# Altium PCB machbiendoilenhdon.PcbDoc
Units mm, origin at the board's own origin, x right, y up, seen from the top; angles counter-clockwise.
Board outline 117 x 94 mm, 2 copper layers (Top Layer, Bottom Layer); 109 components, 122 nets, 460 pads, 163 vias.
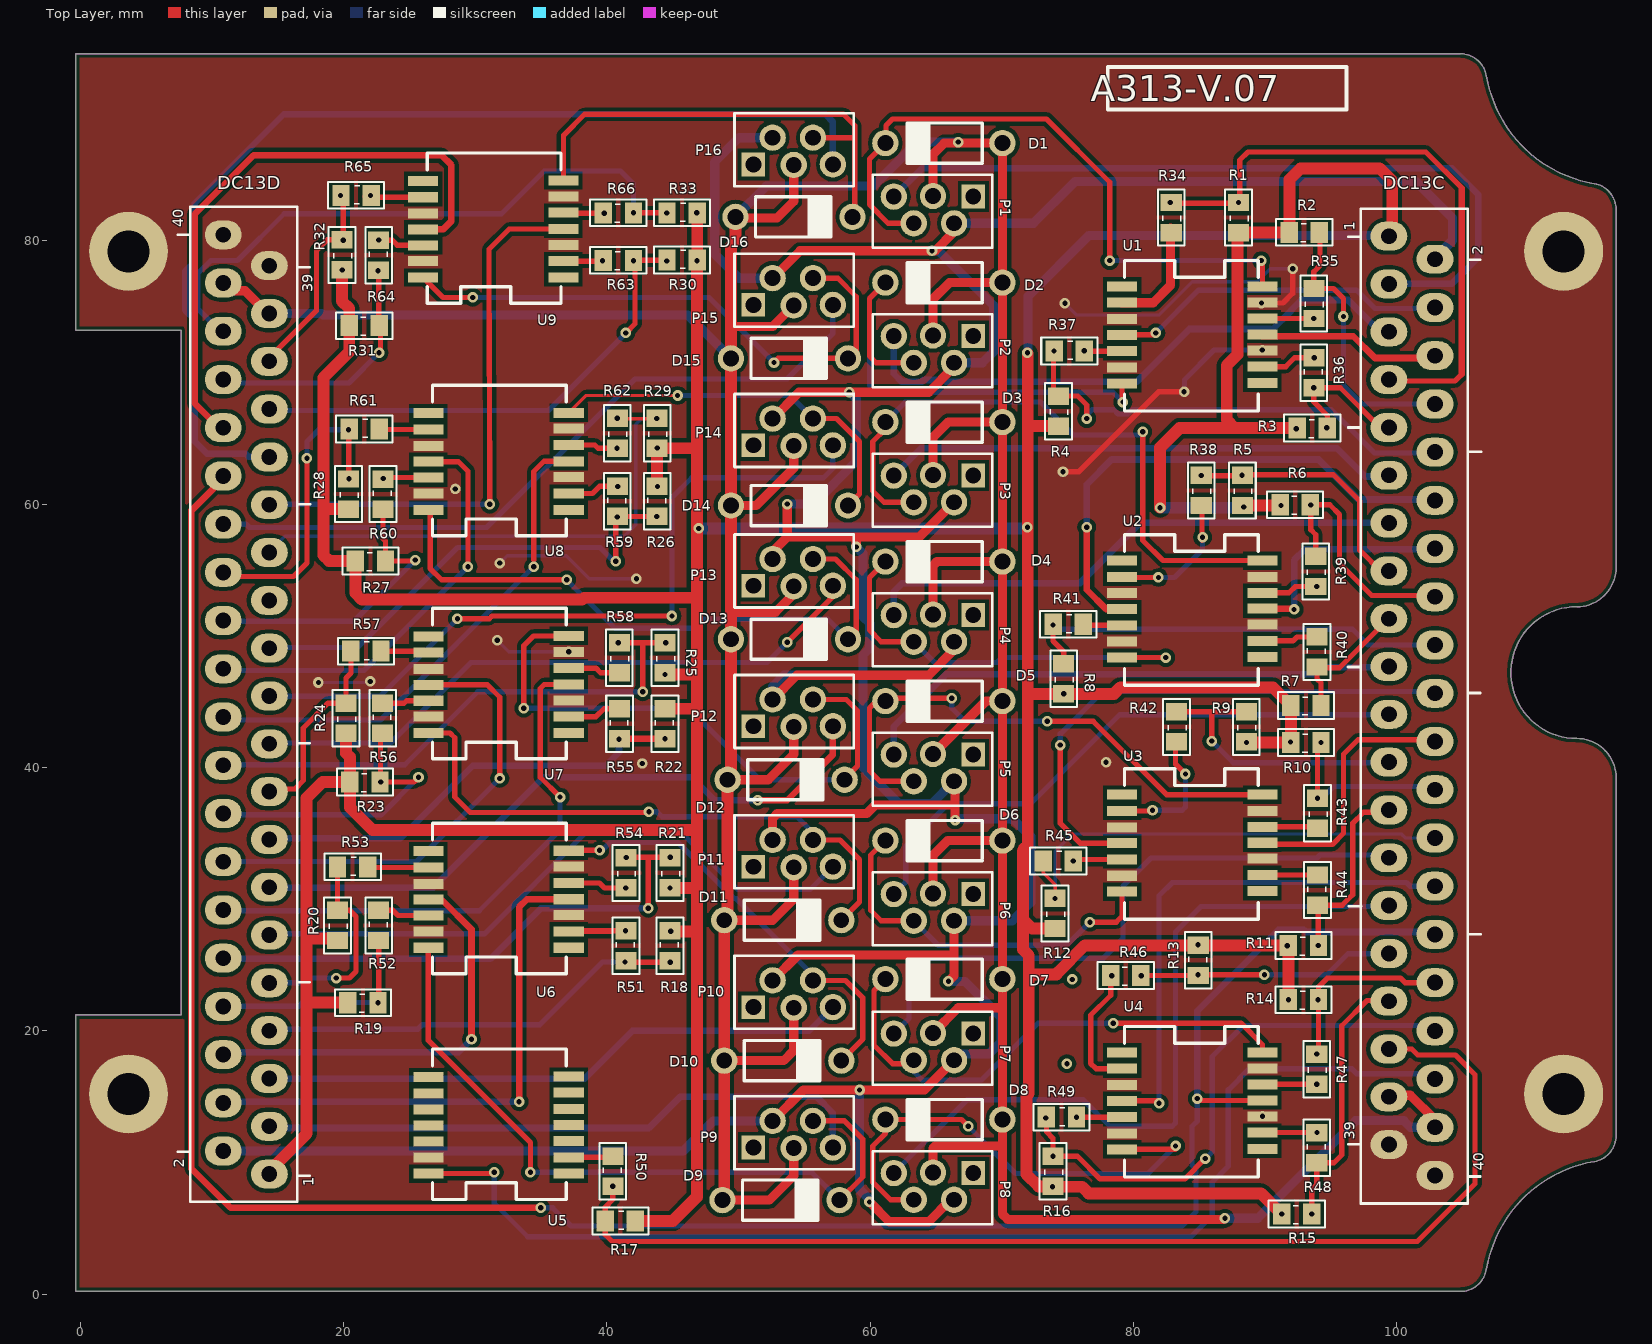
[diagram p0: Top Layer view]
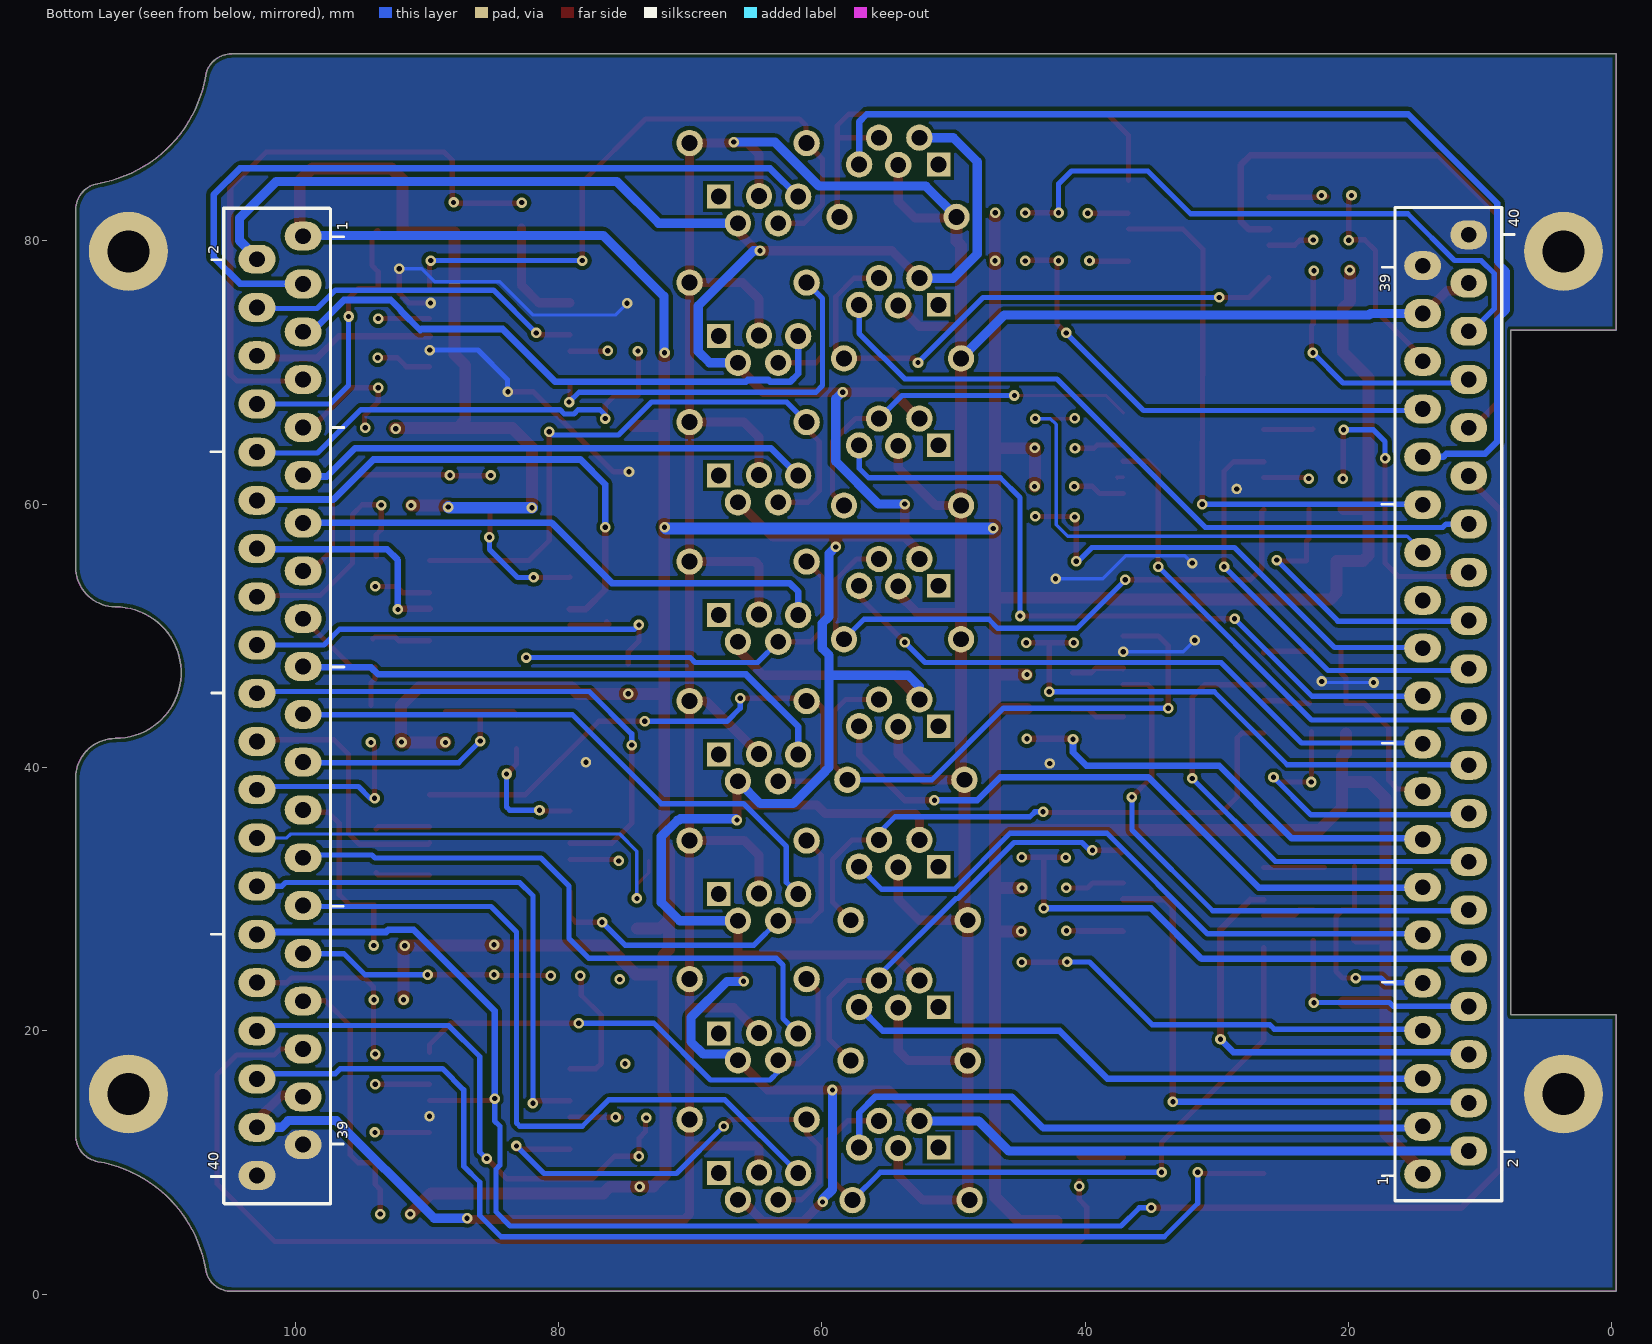
[diagram p1: Bottom Layer view, seen from below]

## Layer stack, top to bottom
Top Solder: solder mask 0.0102, Solder Resist, Dk 3.5
Top Layer: signal copper 0.0356
Dielectric1: dielectric 0.32, FR-4, Dk 4.8
Bottom Layer: signal copper 0.0356
Bottom Solder: solder mask 0.0102, Solder Resist, Dk 3.5

## Board outline
-0.331,21.203 7.669,21.203 7.669,73.203 -0.331,73.203 -0.331,94.203 104.837,94.203 cw(c104.837,92.203) 106.809,92.536 ccw(c116.669,94.203) 115.002,84.343 cw(c114.669,82.371) 116.669,82.371 116.669,55.203 cw(c113.669,55.203) 113.669,52.203 ccw(c113.669,47.203) 113.669,42.203 cw(c113.669,39.203) 116.669,39.203 116.669,12.035 cw(c114.669,12.035) 115.002,10.063 ccw(c116.669,0.203) 106.809,1.869 cw(c104.837,2.203) 104.837,0.203 -0.331,0.203

## Design rules (kind name [scope] priority, off if disabled: settings)
Clearance [All] p1: gap=0.3 ignorepadtopadclearanceinfootprint=FALSE except(0: Arc-Hole Track-Hole SMDPad-Hole THPad-Hole Via-Hole Fill-Hole Poly-Hole Region-Hole Text-Hole; 0.2: Arc-SMDPad Arc-THPad Track-SMDPad Track-THPad SMDPad-THPad THPad-THPad Fill-Fill Fill-Poly Fill-Region Poly-Poly Poly-Region Region-Region)
HoleSize [All] p1: absolutevalues=TRUE maxlimit=5 minlimit=0.025 maxpercent=80.000 minpercent=20.000
MinimumSolderMaskSliver [All] p1: minsoldermaskwidth=0.2
PolygonConnect [All] p1: connectstyle=Direct reliefconductorwidth=0.254 reliefentries=4 polygonreliefangle="90 Angle" airgapwidth=0.254
RoutingVias [All] p1: holewidth=0.4 width=0.8 viastyle="Through Hole" minholewidth=0.4 minwidth=0.8 maxholewidth=0.4 maxwidth=0.8
SilkToSilkClearance [All] p1: silktosilkclearance=0.1
SilkToSolderMaskClearance SilkscreenOverComponentPads [IsPad] p1: minsilkscreentomaskgap=0.01 clearancetoexposedcopper=TRUE
SolderMaskExpansion [All] p1: expansion=0.102
UnRoutedNet [InNet('GND')] p1:
Width Width_2 [(InNet('+27V') OR InNet('+27VB/X'))] p1: maxlimit=3 minlimit=0.3 preferedwidth=0.7 minimp=50.000000 maximp=50.000000 favimp=50.000000
Width Width_1 [(InNet('+5V'))] p2: maxlimit=3 minlimit=0.254 preferedwidth=0.9 minimp=50.000000 maximp=50.000000 favimp=50.000000
Width [All] p3: maxlimit=5 minlimit=0.254 preferedwidth=0.4 minimp=50.000000 maximp=50.000000 favimp=50.000000
25 further rules are at their usual default settings.

## Classes and differential pairs
component class machbiendoilenhdon: D17 J7 J8 J9 J10 J11 J12 J13 J14 J15 J16 J17

## Components (designator, comment, footprint, x,y, rotation, side; value= is the part's Value field where it differs from the comment)
D1 "DIODE" "DIOT _REV1" 61.158,88.056 r270 top
D2 "DIODE" "DIOT _REV1" 61.158,77.461 r270 top
D3 "DIODE" "DIOT _REV1" 61.158,66.865 r270 top
D4 "DIODE" "DIOT _REV1" 61.158,56.27 r270 top
D5 "DIODE" "DIOT _REV1" 61.158,45.674 r270 top
D6 "DIODE" "DIOT _REV1" 61.158,35.079 r270 top
D7 "DIODE" "DIOT _REV1" 61.158,24.556 r270 top
D8 "DIODE" "DIOT _REV1" 61.158,13.888 r270 top
D9 "DIODE" "DIOT _REV1" 57.674,6.5 r90 top
D10 "DIODE" "DIOT _REV1" 57.814,17.094 r90 top
D11 "DIODE" "DIOT _REV1" 57.814,27.762 r90 top
D12 "DIODE" "DIOT _REV1" 58.066,38.43 r90 top
D13 "DIODE" "DIOT _REV1" 58.322,49.098 r90 top
D14 "DIODE" "DIOT _REV1" 58.322,59.258 r90 top
D15 "DIODE" "DIOT _REV1" 58.322,70.434 r90 top
D16 "DIODE" "DIOT _REV1" 58.664,81.18 r90 top
DC13C "CON40" CON40 96.256,83.971 r270 top (schematic designator J1)
DC13D "CON40" CON40 17.516,5.488 r90 top (schematic designator J2)
P1 "ro le PEC-49" "ROLE A313/3_REV4" 69.286,79.42 r90 top
P2 "ro le PEC-49" "ROLE A313/3_REV4" 69.286,68.825 r90 top
P3 "ro le PEC-49" "ROLE A313/3_REV4" 69.286,58.229 r90 top
P4 "ro le PEC-49" "ROLE A313/3_REV4" 69.286,47.634 r90 top
P5 "ro le PEC-49" "ROLE A313/3_REV4" 69.286,37.038 r90 top
P6 "ro le PEC-49" "ROLE A313/3_REV4" 69.286,26.443 r90 top
P7 "ro le PEC-49" "ROLE A313/3_REV4" 69.286,15.847 r90 top
P8 "ro le PEC-49" "ROLE A313/3_REV4" 69.286,5.252 r90 top
P9 "ro le PEC-49" "ROLE A313/3_REV4" 49.686,15.062 r270 top
P10 "ro le PEC-49" "ROLE A313/3_REV4" 49.686,25.73 r270 top
P11 "ro le PEC-49" "ROLE A313/3_REV4" 49.686,36.398 r270 top
P12 "ro le PEC-49" "ROLE A313/3_REV4" 49.686,47.066 r270 top
P13 "ro le PEC-49" "ROLE A313/3_REV4" 49.686,57.734 r270 top
P14 "ro le PEC-49" "ROLE A313/3_REV4" 49.686,68.402 r270 top
P15 "ro le PEC-49" "ROLE A313/3_REV4" 49.686,79.07 r270 top
P16 "ro le PEC-49" "ROLE A313/3_REV4" 49.686,89.738 r270 top
R1 "680r" RES0805 93.436,80.498 r90 top
R2 "680r" RES0805 91.715,75.184 r0 top
R3 "680r" RES0805 92.323,60.314 r0 top
R4 "680r" RES0805 79.761,65.793 r90 top
R5 "680r" RES0805 93.736,59.766 r90 top
R6 "680r" RES0805 91.012,54.491 r0 top
R7 "680r" RES0805 91.837,39.25 r0 top
R8 "680r" RES0805 80.161,45.462 r90 top
R9 "680r" RES0805 94.036,41.812 r90 top
R10 "680r" RES0805 91.837,36.439 r0 top
R11 "680r" RES0805 91.643,21.014 r0 top
R12 "680r" RES0805 79.511,27.637 r90 top
R13 "680r" RES0805 79.464,26.613 r270 top
R14 "680r" RES0805 91.643,16.898 r0 top
R15 "680r" RES0805 91.137,0.614 r0 top
R16 "680r" RES0805 79.361,8.055 r90 top
R17 "680r" RES0805 42.302,11.011 r180 top
R18 "680r" RES0805 39.339,27.727 r270 top
R19 "680r" RES0805 20.212,16.664 r0 top
R20 "680r" RES0805 25.011,26.729 r90 top
R21 "680r" RES0805 50.261,30.723 r90 top
R22 "680r" RES0805 38.964,44.588 r270 top
R23 "680r" RES0805 20.362,33.439 r0 top
R24 "680r" RES0805 25.661,42.468 r90 top
R25 "680r" RES0805 49.886,47.062 r90 top
R26 "680r" RES0805 38.364,61.477 r270 top
R27 "680r" RES0805 20.777,50.224 r0 top
R28 "680r" RES0805 25.852,59.495 r90 top
R29 "680r" RES0805 49.286,64.112 r90 top
R30 "680r" RES0805 46.988,84.011 r180 top
R31 "680r" RES0805 20.31,68.089 r0 top
R32 "680r" RES0805 25.344,77.661 r90 top
R33 "680r" RES0805 46.988,87.586 r180 top
R34 "220r" RES0805 88.336,80.498 r90 top
R35 "220r" RES0805 99.162,73.967 r90 top
R36 "220r" RES0805 88.24,71.252 r270 top
R37 "220r" RES0805 76.402,77.086 r180 top
R38 "220r" RES0805 90.611,59.766 r90 top
R39 "220r" RES0805 99.311,53.612 r90 top
R40 "220r" RES0805 88.489,50.038 r270 top
R41 "220r" RES0805 76.313,56.336 r180 top
R42 "220r" RES0805 88.736,41.812 r90 top
R43 "220r" RES0805 99.436,35.248 r90 top
R44 "220r" RES0805 88.514,31.952 r270 top
R45 "220r" RES0805 75.552,38.361 r180 top
R46 "220r" RES0805 78.148,18.739 r0 top
R47 "220r" RES0805 99.386,15.812 r90 top
R48 "220r" RES0805 88.464,12.377 r270 top
R49 "220r" RES0805 75.802,18.898 r180 top
R50 "220r" RES0805 34.996,10.595 r270 top
R51 "220r" RES0805 35.989,27.727 r270 top
R52 "220r" RES0805 17.216,29.269 r270 top
R53 "220r" RES0805 21.963,37.911 r180 top
R54 "220r" RES0805 46.911,30.723 r90 top
R55 "220r" RES0805 35.514,44.588 r270 top
R56 "220r" RES0805 17.514,45.002 r270 top
R57 "220r" RES0805 22.977,54.288 r180 top
R58 "220r" RES0805 46.411,47.062 r90 top
R59 "220r" RES0805 35.339,61.477 r270 top
R60 "220r" RES0805 17.539,62.027 r270 top
R61 "220r" RES0805 22.852,71.161 r180 top
R62 "220r" RES0805 46.261,64.112 r90 top
R63 "220r" RES0805 39.612,73.058 r0 top
R64 "220r" RES0805 17.216,80.177 r270 top
R65 "220r" RES0805 22.227,88.911 r180 top
R66 "220r" RES0805 39.612,76.664 r0 top
U1 "1HT-251" 1HT-251 79.325,78.634 r270 top
U2 "1HT-251" 1HT-251 79.325,57.806 r270 top
U3 "1HT-251" 1HT-251 79.325,40.026 r270 top
U4 "1HT-251" 1HT-251 79.325,20.454 r270 top
U5 "1HT-251" 1HT-251 36.922,7.056 r90 top
U6 "1HT-251" 1HT-251 36.922,24.209 r90 top
U7 "1HT-251" 1HT-251 36.922,40.525 r90 top
U8 "1HT-251" 1HT-251 36.922,57.473 r90 top
U9 "1HT-251" 1HT-251 36.52,75.116 r90 top

## Footprints (in the part's own frame and the unit in brackets; to place one, negate y for a bottom-side part, rotate by r counter-clockwise, add the part's x,y. Pads: shape width x height; smd on the part's side, far side on the other; paste and mask are expansions set on the pad)
1HT-251 [mil]
  rect 30x90 smd: 1(82.5,-7.5) 2(131.25,-7.5) 3(180,-7.5) 4(227.5,-7.5) 5(276.25,-7.5) 6(325,-7.5) 7(372.5,-7.5) 8(371.25,412.5) 9(322.5,412.5) 10(273.75,412.5) 11(226.25,412.5) 12(178.75,412.5) 13(131.25,412.5) 14(82.5,412.5)
  silkscreen extent 5,0 455,400
CON40 [mil]
  oval 86.6x110.23 / inner round 100 / far side oval 86.6x110.23 hole 47.23 mask+3.93: 1(142.6,123.94)
  oval 86.6x110.23 / inner oval 106.3x118.1 / far side oval 86.6x110.23 hole 47.23 mask+3.93: 2(211.5,261.73) 3(285.57,123.94) 4(355.71,261.73) 5(428.55,123.94) 6(499.92,261.73) 7(571.52,123.94) 8(644.13,261.73) 9(714.5,123.94) 10(788.34,261.73) 11(857.48,123.94) 12(932.55,261.73) 13(1000.45,123.94) 14(1076.76,261.73) 15(1143.43,123.94) 16(1220.97,261.73) 17(1286.4,123.94) 18(1365.18,261.73) 19(1429.38,123.94) 20(1509.39,261.73) 21(1572.35,123.94) 22(1653.6,261.73) 23(1715.33,123.94) 24(1797.81,261.73) 25(1858.3,123.94) 26(1942.02,261.73) 27(2001.28,123.94) 28(2086.23,261.73) 29(2144.26,123.94) 30(2230.44,261.73) 31(2287.23,123.94) 32(2374.65,261.73) 33(2430.21,123.94) 34(2518.86,261.73) 35(2573.18,123.94) 36(2663.07,261.73) 37(2716.16,123.94) 38(2807.29,261.73) 39(2859.13,123.94) 40(2951.5,261.73)
  silkscreen extent 60,40 3035,360
"DIOT _REV1" [mm]
  round 2 hole 1.2 mask+0.127: 1(0.635,0) 2(0.635,8.89)
  silkscreen extent -0.89,1.65 2.16,7.37
RES0805 [mil]
  rect 52x63 smd: 1(5,215) 2(95,215)
  silkscreen extent -34,175 134,255
"ROLE A313/3_REV4" [mm]
  rect 1.8x1.8 hole 1.2 mask-0.3: 1(3.937,1.447)
  round 2 hole 1.2 mask-0.3: 2(3.937,7.485) 3(1.908,2.909) 4(3.977,4.511) 5(1.908,5.973)
  silkscreen extent 0.04,0.01 5.59,9.08

## Part data
P1 P2 P3 P4 P5 P6 P7 P8 P9 P10 P11 P12 P13 P14 P15 P16: library part RELAY_SPDT_0
R1 R2 R3 R4 R5 R6 R7 R8 R9 R10 R11 R12 R13 R14 R15 R16 R17 R18 R19 R20 R21 R22 R23 R24 R25 R26 R27 R28 R29 R30 R31 R32 R33 R34 R35 R36 R37 R38 R39 R40 R41 R42 R43 R44 R45 R46 R47 R48 R49 R50 R51 R52 R53 R54 R55 R56 R57 R58 R59 R60 R61 R62 R63 R64 R65 R66: library part R
U1 U2 U3 U4 U6 U7 U8 U9: library part 1HT-251_2
U5: library part 1HT-251_4

## Free pads (board coordinates)
  round 0.8 hole 0.4: 3(28.5,61.15) 3(37.112,48.78) 3(42.7,40.3) 3(77.925,40.4) 3(89.803,13.501) 3(92.1,77.875)
  round 6 hole 3.2: CK(3.675,15.2) CK(3.675,79.2) CK(112.675,15.2) CK(112.675,79.2)

## Via types
v1: diameter 0.8, hole 0.4, Top Layer to Bottom Layer, 163 vias

## Nets (pads, with @x,y where several pads share a name; then routed paths per layer and width w, separated by ;. In a path a pad name is that pad's centre, name@x,y a point inside that pad or via, vN(x,y) a via of type N, cw(c..) or ccw(c..) an arc to the next point about the centre after c; other vN are vias at no path point)
+5V: DC13C.1 DC13D.1 R1.1 R2.1 R3.1 R4.1 R5.1 R6.1 R7.1 R8.1 R9.1 R10.1 R11.1 R12.1 R13.1 R14.1 R15.1 R16.1 R17.1 R18.1 R19.1 R20.1 R21.1 R22.1 R23.1 R24.1 R25.1 R26.1 R27.1 R28.1 R29.1 R30.1 R31.1 R32.1 R33.1 | length 482.4
  Top Layer w0.9: DC13D.1@14.118,9.11 17.2,12.192 17.2,27 ; 17.293,22.157 R19.1@20.396,22.157 ; R20.1@19.375,26.988 19.363,27 17.2,27 ; R32.1 19.883,75.417 20.437,74.863 R31.1 20.437,71.562 18.475,69.6 18.475,59.622 ; R24.1 20.2,41.075 20.489,40.786 R23.1 ; R28.1 18.475,59.622 ; R17.1 45.025,5.55 46.848,7.373 46.848,27.543 ; v1(43.825,64.267) R29.1 ; v1(43.85,61.342) 43.825,61.367 R29.1 ; R22.1 46.759,44.461 46.848,44.55 ; v1(44.425,47.05) 46.723,47.05 46.848,47.175 ; v1(44.8,30.85) 46.823,30.85 46.848,30.825 ; v1(44.85,27.55) 46.841,27.55 46.848,27.543 ; 46.713,52.885 38.26,52.885 38.125,52.75 21.404,52.75 20.904,53.25 R27.1 18.906,55.685 18.475,56.116 18.475,59.622 ; R30.1@46.848,78.646 46.848,64.25 ; R30.1@46.87,78.646 R33.1@46.87,81.867 ; v1@71.974,71.451 71.974,65.75 ; v1(73.85,8.15) 76.1,8.15 76.6,7.65 89.689,7.65 v1(91.264,6.075) ; R16.1 72.793,8.182 71.875,9.1 71.875,15.052 72.05,15.227 72.05,24.275 ; R12.1 72.311,27.764 71.6,28.475 ; R4.1 72.144,65.92 71.974,65.75 ; v1(82.025,59.725) 82.025,64.3 83.5,65.775 87.697,65.775 ; v1(88.375,59.775) 88.5,59.9 R6.1@91.191,59.9 ; R9.1 88.614,41.9 R10.1 R7.1 90.6,46.075 79.01,46.075 78.524,45.589 v1(74.7,45.589) 71.974,45.589 ; R6.1 R6.1@91.191,59.9 ; v1(91.2,59.9) R6.1@91.191,59.9 ; v1(91.675,26.45) 91.77,26.355 R14.1 ; R11.1@91.75,26.475 84.936,26.475 R13.1 76.31,26.486 74.2,24.376 74.2,24.325 74.15,24.275 72.05,24.275 ; R3.1 87.697,65.775 ; DC13C.1@99.654,80.349 99.654,84.546 98.7,85.5 92.7,85.5 91.842,84.642 91.842,80.779 91.688,80.625 R1.1 87.897,80.625 87.897,71.345 87.085,70.533 87.085,66.387 87.697,65.775 ; 17.2,27 17.2,37.679 18.421,38.9 R23.1 ; R23.1 20.489,36.961 22.2,35.25 46.848,35.25 ; R29.1 46.837,64.239 46.848,64.25 ; 46.848,27.543 46.848,30.825 ; 46.848,30.825 46.848,35.25 ; 46.848,35.25 46.848,44.55 ; 46.848,44.55 46.848,47.175 ; 46.848,47.175 46.848,64.25 ; 71.6,28.475 71.6,26.175 72.05,25.725 72.05,24.275 ; 71.6,28.475 71.6,33.662 71.698,33.76 71.698,33.839 71.974,34.115 71.974,45.589 ; 71.974,45.589 71.974,65.75
  Bottom Layer w0.7: v1@71.999,71.549 71.999,75.799 76.6,80.4 DC13C.1@99.348,80.4
  Bottom Layer w0.9: v1@47.057,58.143 v1@71.843,58.143 ; v1(82.025,59.725) 88.325,59.725 v1(88.375,59.775) ; DC13C.1@99.348,80.4 DC13C.1@99.654,80.094
  other v1: 91.775,22.35 84.9,26.525 88.591,41.9 91.925,41.925 46.975,58.15 71.95,58.25 92.376,65.725 71.95,71.5 19.9,77.775 46.85,78.475 46.825,82.125
+27V: D1.2 D2.2 D3.2 D4.2 D5.2 D6.2 D7.2 D8.2 D9.2 D10.2 D11.2 D12.2 D13.2 D14.2 D15.2 D16.2 DC13C.37 DC13C.38 DC13D.37 DC13D.38 P1.4 P2.4 P3.4 P4.4 P5.4 P6.4 P7.4 P8.4 P9.4 P10.4 P11.4 P12.4 P13.4 P14.4 P15.4 P16.4 | length 381
  Top Layer w0.7: DC13D.38@10.894,76.206 12.522,76.206 DC13D.37@14.368,74.36 ; D9.2@48.924,7.275 D9.2 52.335,7.135 54.197,8.997 P9.4 ; D10.2 53.429,17.729 54.197,18.497 P10.4 ; D11.2@49.176,28.649 D11.2 52.597,28.397 54.197,29.997 P11.4 ; D12.2@49.432,39.321 D12.2 52.265,39.065 54.197,40.997 P12.4 ; 49.432,51.775 52.8,51.775 54.197,53.172 P13.4 ; D14.2 51.343,59.893 54.197,62.747 P14.4 ; 49.432,73.5 52.603,73.5 P15.4 ; D16.2 49.774,81.571 49.94,81.737 52.937,81.737 54.197,82.997 P16.4 ; P8.4 64.775,11.075 64.95,11.25 70.048,11.25 ; P7.4 66.701,21.75 69.798,21.75 70.048,21.5 ; P6.4 64.775,33.325 65.894,34.444 D6.2 ; P5.4 68.8,45.039 D5.2 ; P4.4 64.775,55.325 65.085,55.635 D4.2 ; P3.4 64.775,65.075 65.93,66.23 D3.2 ; P2.4 64.775,75.575 66.026,76.826 D2.2 ; P1.4 64.775,86.575 65.621,87.421 D1.2 D2.2 ; v1(86.95,5.75) 86.873,5.673 70.45,5.673 70.048,6.075 70.048,11.25 ; DC13C.37@99.404,15.099 101.032,15.099 DC13C.38@102.878,13.253 ; 70.048,11.25 D8.2 70.048,21.5 ; 70.048,21.5 D7.2 D6.2 ; D6.2 D5.2 ; D5.2 D4.2 ; D4.2 D3.2 ; D3.2 D2.2
  Top Layer w0.9: D9.2@48.924,7.275 D10.2 D11.2 ; D11.2@49.176,28.649 D12.2 ; D12.2@49.432,39.321 D13.2 49.432,51.775 D14.2 D15.2 49.432,73.5 49.432,79.625 49.774,79.967 D16.2@49.774,81.571
  Bottom Layer w0.7: DC13D.37 18.332,74.478 18.45,74.36 46.141,74.36 D15.2 ; D16.2 52.11,84.151 60.222,84.151 63.57,87.5 v1@66.45,87.5 ; v1(86.95,5.75) 89.45,5.75 96.875,13.175 100.528,13.175 101.037,12.666 DC13C.38
  other v1: 66.7,87.5
+27VB/X: DC13C.2 DC13D.2 P1.3 P2.3 P3.3 P4.3 P5.3 P6.3 P7.3 P8.3 P9.3 P10.3 P11.3 P12.3 P13.3 P14.3 P15.3 P16.3 | length 329.6
  Top Layer w0.7: P9.3 54.941,15.5 v1(59.2,15.5) 64.122,15.5 P7.3 ; P10.3 54.523,25.75 66.2,25.75 ; P11.3 52.595,36.145 52.95,36.5 59.75,36.5 60.4,37.15 66.45,37.15 ; P12.3 54.437,47 64.45,47 66.377,48.927 P4.3 ; P13.3 52.595,56.395 53.7,57.5 ; P14.3 54.601,68.5 v1(58.425,68.5) 64.45,68.5 66.377,70.427 P2.3 ; P15.3 54.683,79.25 v1(64.7,79.25) 64.95,79.25 66.377,80.677 P1.3 ; v1(53.7,60) 53.7,57.5 ; v1(58.95,56.75) 58.95,57.5 ; v1(59.95,7) 61.45,5.5 64.45,5.5 66.11,7.16 P8.3 ; v1(65.95,23.75) 66.377,24.177 P6.3 ; P5.3 66.45,38.873 66.45,37.15 ; P3.3 63.74,57.5 58.95,57.5 ; v1(66.45,36) 66.45,37.15 ; 53.7,57.5 58.95,57.5
  Bottom Layer w0.7: DC13D.2@11.118,10.86 45.81,10.86 48.104,13.154 P9.3 ; P12.3 52.595,46.145 53.45,47 59.45,47 ; P15.3 50.038,77.162 48.2,79 48.2,86 50.03,87.83 P16.3 ; v1(53.7,60) 55.7,60 58.95,63.25 58.95,68 58.45,68.5 v1(58.425,68.5) ; v1(58.95,56.75) 59.45,56.25 59.45,51.461 59.972,50.939 59.972,49.05 59.45,48.528 59.45,47 ; v1(59.2,15.5) 59.2,7.942 59.95,7.192 v1(59.95,7) ; v1(64.7,79.25) 65.2,79.25 69.389,75.061 69.389,71.592 68.529,70.732 P2.3 ; v1(65.95,23.75) 67.2,23.75 69.95,21 69.95,19.176 69.009,18.234 66.856,18.234 P7.3 ; P6.3 70.8,28.35 72.2,29.75 72.2,34.75 70.95,36 70.825,36 70.731,36.094 66.544,36.094 v1(66.45,36) ; P5.3 64.681,37.25 62.2,37.25 59.716,39.734 59.716,39.748 59.45,40.015 59.45,47 ; P1.3 72.403,81.328 75.575,84.5 101.45,84.5 104.229,81.721 104.229,80.023 103.021,78.815 102.654,78.815 DC13C.2@102.654,78.599
GND: DC13C.39 DC13C.40 DC13D.39 DC13D.40 pad.3 pad.CK U1.3 U1.6 U1.10 U1.13 U2.3 U2.6 U2.10 U2.13 U3.3 U3.6 U3.10 U3.13 U4.3 U4.6 U4.10 U4.13 U5.13 U6.3 U6.6 U6.10 U6.13 U7.3 U7.6 U7.10 U7.13 U8.3 U8.6 U8.10 U8.13 U9.3 U9.6 U9.10 U9.13 | length 65.4
  Top Layer w0.254: v1@21.753,46.576 21.8,46.529 v1(22.028,46.529) ; U8.3 37.62,62.045 U8.3@37.55,61.975
  Top Layer w0.4: v1(74.65,62.45) 75.836,62.45 81.911,68.525 v1(83.85,68.525) ; U1.13 89.75,75.3 v1(89.725,75.275) 91.35,75.275 92.1,76.025 pad.3@92.1,77.875
  Bottom Layer w0.254: v1(18.1,46.45) 21.73,46.45 21.753,46.428 21.901,46.576 21.949,46.529 v1(22.028,46.529) ; v1(31.671,49.654) 32.545,48.78 pad.3@37.112,48.78 ; v1(31.875,55.525) 32.427,56.077 36.923,56.077 38.675,54.325 v1(42.254,54.325) ; v1(74.8,75.25) 75.688,74.362 81.937,74.362 84.452,76.877 89.402,76.877 90.4,77.875 pad.3@92.1,77.875
  Bottom Layer w0.4: v1(83.85,68.525) 83.85,68.5 v1@83.875,68.475 ; v1@83.9,68.45 v1@83.875,68.475 ; v1(89.775,71.7) 86.125,71.7 83.875,69.45 v1@83.875,68.475
IXPRAVN: DC13C.36 U5.14 | length 90.6
  Top Layer w0.4: U5.14 31.351,9.151 v1(31.45,9.25)
  Bottom Layer w0.4: v1(31.45,9.25) 31.45,6.9 34,4.35 84.375,4.35 85.99,5.965 85.99,8.493 87.212,9.715 87.212,15.512 88.82,17.12 96.575,17.12 96.97,16.725 102.904,16.725 DC13C.36
NetD1_1: D1.1 P1.5 U1.14 | length 49.2
  Top Layer w0.4: P1.5 61.372,81.328 59.95,82.75 59.95,86.213 D1.1 61.2,87.463 61.2,88.75 61.7,89.25 73.4,89.25 78.2,84.45 v1(78.2,78.5) ; U1.14 v1@89.803,78.647
  Bottom Layer w0.4: v1(78.2,78.5) v1(89.7,78.5)
NetD2_1: D2.1 P2.5 U1.7 | length 39.2
  Top Layer w0.4: D2.1 59.95,75.617 59.95,71.25 60.468,70.732 P2.5 ; v1@79.135,67.75 U1.7
  Bottom Layer w0.4: D2.1 59.95,75.617 59.95,69 60.45,68.5 78.45,68.5 v1(79.2,67.75)
NetD3_1: D3.1 P3.5 U2.14 | length 48.4
  Top Layer w0.4: D3.1 61.158,65.708 60.2,64.75 60.2,61 61.063,60.137 P3.5 ; v1(80.7,65.5) 80.7,57.25 82.239,55.711 U2.14
  Bottom Layer w0.4: D3.1 62.678,67.75 72.95,67.75 75.45,65.25 80.45,65.25 v1(80.7,65.5)
NetD4_1: D4.1 P4.5 U2.7 | length 32.6
  Top Layer w0.4: D4.1 59.95,54.427 59.95,50.438 60.847,49.541 P4.5 ; U2.7@79.229,48.345 v1(82.45,48.345)
  Bottom Layer w0.4: P4.5 64.879,47.975 69.625,47.975 69.995,48.345 v1(82.45,48.345)
NetD5_1: D5.1 P5.5 U3.14 | length 42.3
  Top Layer w0.4: P5.5@63.45,38.809 P5.5 60.754,38.946 59.95,39.75 59.95,44.5 60.7,45.25 v1(66.2,45.25) ; v1(73.45,43.5) 76.95,43.5 82.519,37.931 U3.14
  Bottom Layer w0.4: v1(66.2,45.25) 66.2,44.5 67.2,43.5 v1(73.45,43.5)
NetD6_1: D6.1 P6.5 U3.7 | length 28.7
  Top Layer w0.4: D6.1 60.05,33.336 60.05,29.15 60.85,28.35 P6.5 ; v1(76.7,28.25) 78.7,28.25 79.135,28.685 U3.7
  Bottom Layer w0.4: P6.5 65.163,26.5 74.95,26.5 v1(76.7,28.25)
NetD7_1: D7.1 P7.5 U4.14 | length 39.7
  Top Layer w0.4: D7.1 60.301,23.064 60.301,18.899 61.7,17.5 63.058,17.5 P7.5 ; v1(78.475,20.575) 88.167,20.575 89.803,18.939 U4.14
  Bottom Layer w0.4: P7.5 63.313,16.887 63.945,16.255 68.455,16.255 72.775,20.575 v1(78.475,20.575)
NetD8_1: D8.1 P8.5 U4.7 | length 37.5
  Top Layer w0.4: P8.5 61.54,7.16 60.2,8.5 60.2,11.25 61.158,12.208 D8.1 66.947,13.253 v1(67.45,12.75) ; U4.7 79.142,11 v1@83.2,11
  Bottom Layer w0.4: v1(67.45,12.75) 71.05,9.15 81.1,9.15 v1(83.2,11.25)
NetD9_1: D9.1 P9.5 U6.14 | length 54.3
  Top Layer w0.4: U6.14 26.444,19.256 34.2,11.5 v1(34.2,9.25) ; P9.5 58.046,13.154 59.45,11.75 59.45,8.911 D9.1
  Bottom Layer w0.4: v1(34.2,9.25) 55.559,9.25 D9.1
NetD10_1: D10.1 P10.5 U6.7 | length 33.5
  Top Layer w0.4: U6.7 37.283,33.5 37.483,33.7 v1(39.45,33.7) ; P10.5 58.128,23.822 59.45,22.5 59.45,19.365 D10.1
  Bottom Layer w0.4: v1@39.418,33.5 39.45,33.532 v1(39.45,33.7) 39.65,33.7 40.25,34.3 45.41,34.3 49.66,30.05 49.825,30.05 55.659,24.216 P10.5
NetD11_1: D11.1 P11.5 U7.14 | length 44.9
  Top Layer w0.4: U7.14 28.079,42.621 28.45,42.25 28.45,37.75 29.625,36.575 43.15,36.575 v1(43.2,36.625) ; P11.5 57.71,34.49 59.2,33 59.2,29.783 D11.1
  Bottom Layer w0.4: v1(43.2,36.625) 43.825,36.625 44.2,36.25 54.45,36.25 55.659,35.041 P11.5
NetD12_1: D12.1 P12.5 U7.7 | length 44.9
  Top Layer w0.4: v1(33.7,44.5) 33.7,49.25 34.437,49.987 U7.7 ; P12.5 58.192,45.158 59.05,44.3 59.05,40.1 D12.1@57.7,38.75
  Bottom Layer w0.4: v1(33.7,44.5) 46.2,44.5 51.635,39.065 D12.1
NetD13_1: D13.1 P13.5 U8.14 | length 47.8
  Top Layer w0.4: U8.14 26.585,59.428 26.585,55.115 27.45,54.25 v1(36.95,54.25) ; P13.5 57.374,55.826 58.95,54.25 58.95,50.361 D13.1
  Bottom Layer w0.4: v1(36.95,54.25) 40.625,50.575 46.65,50.575 47.325,51.25 56.805,51.25 D13.1
NetD14_1: D14.1 P14.5 U8.7 | length 29.3
  Top Layer w0.254: U8.7 38.428,68.25 v1(45.375,68.25)
  Top Layer w0.4: P14.5 57.456,66.494 59.2,64.75 59.2,60.771 D14.1
  Bottom Layer w0.4: v1(45.375,68.25) 53.904,68.25 P14.5
NetD15_1: D15.1 P15.5 U9.14 | length 43.9
  Top Layer w0.4: U9.14 27.554,75.7 v1(29.825,75.7) ; v1(52.7,70.75) 53.019,71.069 D15.1 58.95,71.697 58.95,75.75 57.538,77.162 P15.5
  Bottom Layer w0.4: v1(29.825,75.7) 47.75,75.7 v1(52.7,70.75)
NetD16_1: D16.1 P16.5 U9.7 | length 36.8
  Top Layer w0.4: U9.7 36.71,88.01 38.312,89.612 57.968,89.612 58.83,88.75 58.83,87.83 ; P16.5 58.83,87.83 ; D16.1@58.83,81.737 58.83,87.83
NetD17_1: 
NetD17_2: 
NetJ16_1: 
NetR34_1: R34.1 U1.2 | length 8.6
  Top Layer w0.7: U1.2 81.5,75.3 82.817,76.617 R34.1@82.817,80.952
NetR35_1: R35.1 U1.12 | length 3.9
  Top Layer w0.4: U1.12 v1(93.701,74.094)
NetR36_1: R36.1 U1.9 | length 4.2
  Top Layer w0.4: U1.9 91.568,70.443 92.25,71.125 R36.1
  other v1: 93.725,71.122
NetR37_1: R37.1 U1.5 | length 3.1
  Top Layer w0.4: R37.1@76.066,71.617 U1.5
  other v1: 76.275,71.656
NetR38_1: R38.1 U2.2 | length 10.8
  Top Layer w0.4: U2.2 79.18,54.427 v1(81.9,54.427) ; R38.1@85.207,59.839 85.207,57.257 85.25,57.3 v1(85.25,57.475)
  Bottom Layer w0.4: v1(81.9,54.427) 83.127,54.427 85.25,56.55 v1(85.25,57.475)
NetR39_1: R39.1 U2.12 | length 4.2
  Top Layer w0.4: U2.12 91.825,53.266 92.298,53.739 R39.1
  other v1: 93.925,53.75
NetR40_1: R40.1 U2.9 | length 4.3
  Top Layer w0.4: U2.9 92.125,49.615 92.421,49.911 R40.1 ; R40.1@94.099,49.762 R40.1@94.123,49.786
NetR41_1: R41.1 U2.5 | length 3
  Top Layer w0.4: R41.1 76.272,50.789 U2.5 ; R41.1@76.338,51.061 R41.1@76.355,51.044
NetR42_1: R42.1 U3.2 | length 9.7
  Top Layer w0.4: U3.2 81.392,36.692 v1(81.45,36.75) ; R42.1@83.201,41.414 83.201,40.249 v1(83.95,39.5)
  Bottom Layer w0.4: v1(81.45,36.75) 83.7,36.75 83.95,37 v1(83.95,39.5)
NetR43_1: R43.1 U3.12 | length 4.1
  Top Layer w0.4: U3.12 93.701,35.486 R43.1@93.869,35.318
NetR44_1: R44.1 U3.9 | length 4.1
  Top Layer w0.4: U3.9 93.698,31.835 R44.1@93.869,32.006
NetR45_1: R45.1 U3.5 | length 3.8
  Top Layer w0.4: v1(75.425,32.9) 75.534,33.009 U3.5
NetR46_1: R46.1 U4.2 | length 9.9
  Top Layer w0.4: R46.1 78.275,22.7 76.75,21.175 76.75,17.525 77.155,17.12 U4.2
  other v1: 78.35,24.175
NetR47_1: R47.1 U4.12 | length 4.2
  Top Layer w0.4: U4.12 89.828,15.939 R47.1@93.794,15.939 ; R47.1@93.869,16.014 R47.1@93.794,15.939 ; v1(93.925,15.939) R47.1@93.794,15.939
NetR48_1: R48.1 U4.9 | length 4.1
  Top Layer w0.4: U4.9 93.8,12.262 R48.1@93.869,12.194
  other v1: 93.95,12.275
NetR49_1: R49.1 U4.5 | length 3.9
  Top Layer w0.4: R49.1@75.273,13.437 R49.1 U4.5
  other v1: 75.675,13.425
NetR50_1: R50.1 U5.2 | length 3.4
  Top Layer w0.4: U5.2 40.379,10.39 R50.1
NetR51_1: R51.1 U6.2 | length 7.6
  Top Layer w0.4: 40.4,27.543 U6.2 37.17,27.6 v1(41.425,27.6)
NetR52_1: R52.1 U6.12 | length 3.9
  Top Layer w0.4: R52.1 23.764,29.142 24.15,28.756 U6.12@26.438,28.756
NetR53_1: R53.1 U6.9 | length 4.6
  Top Layer w0.4: R53.1@21.836,32.401 U6.9
NetR54_1: R54.1 U6.5 | length 4.5
  Top Layer w0.4: U6.5 39.449,31.226 39.825,30.85 v1(41.45,30.85)
NetR55_1: R55.1 U7.2 | length 4.1
  Top Layer w0.4: U7.2 39.184,43.859 39.786,44.461 R55.1
NetR56_1: R56.1 U7.12 | length 3.5
  Top Layer w0.4: R56.1 24.6,44.875 24.79,45.065 U7.12
NetR57_1: R57.1 U7.9 | length 3.6
  Top Layer w0.4: R57.1 26.334,48.827 U7.9
NetR58_1: R58.1 U7.5 | length 4
  Top Layer w0.4: U7.5@37.154,47.5 U7.5 39.174,47.542 39.526,47.189 R58.1
NetR59_1: R59.1 U8.2 | length 3.9
  Top Layer w0.4: U8.2 38.907,60.807 39.45,61.35 R59.1
  other v1: 40.825,61.342
NetR60_1: R60.1 U8.12 | length 3.5
  Top Layer w0.4: v1(23.025,61.942) 23.096,62.013 U8.12 ; R60.1@23.185,61.776 R60.1@23.188,61.779
NetR61_1: R61.1 U8.9 | length 3.7
  Top Layer w0.4: R61.1 22.76,65.665 U8.9
NetR62_1: R62.1 U8.5 | length 3.8
  Top Layer w0.4: U8.5 39.09,64.49 39.341,64.239 R62.1
  other v1: 40.775,64.242
NetR63_1: R63.1 U9.2 | length 3
  Top Layer w0.4: U9.2 39.582,78.45 R63.1@39.651,78.519
  other v1: 39.675,78.492
NetR64_1: R64.1 U9.12 | length 3.5
  Top Layer w0.4: R64.1 23.7,80.05 24.094,79.656 U9.12
  other v1: 22.677,80.067
NetR65_1: R65.1 U9.9 | length 4.6
  Top Layer w0.4: R65.1@21.656,83.371 R65.1@22.179,83.371 ; R65.1 R65.1@22.179,83.371 ; U9.9@25.979,83.371 U9.9 22.243,83.307 R65.1@22.179,83.371
  other v1: 22.05,83.442
NetR66_1: R66.1 U9.5 | length 3
  Top Layer w0.4: U9.5@36.742,82.101 R66.1@39.7,82.101
  other v1: 39.8,82.092
RC-1: DC13C.3 P1.2 | length 58.3
  Bottom Layer w0.5: P1.2 63.944,85.5 104.2,85.5 106.2,83.5 106.2,78.75 104.199,76.749 DC13C.3@99.654,76.749
  Bottom Layer w0.9: DC13C.3@99.654,76.749 DC13C.3@99.654,76.849
RC-2: DC13C.4 U1.4 | length 25.5
  Top Layer w0.4: U1.4 81.556,72.856 v1(81.7,73)
  Bottom Layer w0.4: v1(81.7,73) 84.95,76.25 96.95,76.25 98.351,74.849 DC13C.4@102.654,74.849
RC-3: DC13C.5 P2.2 | length 45.1
  Bottom Layer w0.4: DC13C.5@98.706,73.099 99.654,73.099 DC13C.5@99.87,72.883
  Bottom Layer w0.5: P2.2 61.801,69.899 62.418,69.282 63.913,69.282 64.056,69.425 65.633,69.425 65.776,69.282 80.232,69.282 84.25,73.3 90.4,73.3 90.5,73.2 91.975,74.675 91.975,74.725 92.75,75.5 96.305,75.5 DC13C.5@98.706,73.099
RC-4: DC13C.6 U1.11 | length 13.5
  Top Layer w0.5: U1.11@89.803,72.75 96.7,72.75 98.351,71.099 DC13C.6@102.654,71.099
RC-5: DC13C.11 P3.2 | length 39.6
  Bottom Layer w0.5: P3.2 63.885,64.25 95.45,64.25 97.601,62.099 DC13C.11@99.654,62.099
RC-6: DC13C.12 U2.4 | length 39.5
  Top Layer w0.5: v1(76.45,58.25) 76.45,53.5 77.922,52.028 U2.4
  Bottom Layer w0.5: v1(76.45,58.25) 76.45,61.5 78.335,63.385 94.065,63.385 97.101,60.349 DC13C.12@102.654,60.349
RC-7: DC13C.13 P4.2 | length 41.8
  Bottom Layer w0.5: P4.2 61.801,53.351 62.45,54 75.95,54 80.549,58.599 DC13C.13@99.654,58.599
RC-8: DC13C.14 U2.11 | length 17
  Top Layer w0.4: v1@92.141,52.059 v1(92.2,52)
  Top Layer w0.5: U2.11 v1@92.141,52.059
  Bottom Layer w0.4: DC13C.14@102.616,56.561 DC13C.14@102.654,56.599
  Bottom Layer w0.5: v1(92.2,52) 92.2,55.75 93.011,56.561 DC13C.14@102.616,56.561
RC-9: DC13C.19 P5.2 | length 41.8
  Bottom Layer w0.5: P5.2 61.801,43.101 65.762,47.062 93.7,47.062 94.237,47.599 DC13C.19@99.654,47.599
RC-10: DC13C.20 U3.4 | length 41.9
  Top Layer w0.4: v1(74.45,41.7) 74.45,35.75 75.95,34.25 79.132,34.25 U3.4
  Bottom Layer w0.4: v1(74.45,41.7) 74.45,42.55 77.675,45.775 102.83,45.775 DC13C.20@102.904,45.849
RC-11: DC13C.21 P6.2 | length 45.1
  Bottom Layer w0.4: P6.2 62.7,31.279 62.7,34 65.95,37.25 72.2,37.25 78.95,44 DC13C.21@99.654,44
RC-12: DC13C.22 U3.11 | length 20
  Top Layer w0.4: U3.11 89.924,34.158 95.108,34.158 95.95,35 95.95,41 97.049,42.099 DC13C.22@102.904,42.099
RC-13: DC13C.27 P7.2 | length 48.2
  Bottom Layer w0.4: P7.2@61.801,19.784 62.95,20.934 62.95,25 63.45,25.5 77.7,25.5 79.2,27 79.2,31 81.328,33.128 93.95,33.128 94.171,33.349 DC13C.27@99.654,33.349
RC-14: DC13C.28 U4.4 | length 39.9
  Top Layer w0.4: U4.4 v1@81.775,14.675
  Bottom Layer w0.4: v1(81.95,14.5) 81.95,30.25 82.958,31.258 100.742,31.258 101.02,30.98 DC13C.28
RC-15: DC13C.29 P8.2 | length 56.2
  Bottom Layer w0.4: P8.2 67.365,14.753 70.669,14.753 70.672,14.75 76.2,14.75 78.2,12.75 82.95,12.75 83.2,13 83.2,27.5 85.142,29.442 DC13C.29@99.45,29.442
RC-16: DC13C.30 DC13D.30 U4.11 | length 173.4
  Top Layer w0.254: v1@84.7,15 v1(84.855,14.845) v1@84.993,14.707
  Top Layer w0.4: v1@84.993,14.707 U4.11
  Top Layer w0.5: DC13D.30@10.894,61.956 8.45,59.512 8.45,9.525 11.425,6.55 v1(34.975,6.55)
  Bottom Layer w0.4: v1(34.975,6.55) 35.9,6.55 37.275,5.175 83.688,5.175 84.761,6.248 84.761,9.481 84.45,9.792 84.45,12.75 84.855,13.155 v1(84.855,14.845)
  Bottom Layer w0.5: v1(84.855,14.845) 84.855,21.505 91.007,27.657 92.95,27.657 93.105,27.503 DC13C.30@102.878,27.503
RC-17: DC13D.3 P9.2 | length 47.2
  Bottom Layer w0.4: P9.2@57.159,11.137 P9.2
  Bottom Layer w0.5: DC13D.3@14.118,12.61 43.2,12.61 45.59,15 55.935,15 57.159,13.776 P9.2@57.159,11.137
RC-18: DC13D.4 U6.4 | length 41.2
  Top Layer w0.5: v1(33.34,14.61) 33.34,29.39 33.938,29.988 U6.4
  Bottom Layer w0.4: v1(33.34,14.61) v1@33.45,14.5
  Bottom Layer w0.5: DC13D.4@11.118,14.61 v1(33.34,14.61)
RC-19: DC13D.5 P10.2 | length 45.3
  Bottom Layer w0.5: DC13D.5@14.118,16.36 38.31,16.36 41.95,20 55.378,20 P10.2
RC-20: DC13D.6 U6.11 | length 31.6
  Top Layer w0.4: U6.11 U6.11@27.469,29.956
  Top Layer w0.5: U6.11@27.469,29.956 29.725,27.7 v1(29.725,19.35)
  Bottom Layer w0.5: DC13D.6@11.118,18.36 28.735,18.36 v1(29.725,19.35)
RC-21: DC13D.11 P11.2 | length 48.7
  Bottom Layer w0.4: DC13D.11@14.118,27.36 30.7,27.36 38.34,35 45.7,35 49.95,30.75 55.46,30.75 P11.2
RC-22: DC13D.12 U7.4 | length 41.5
  Top Layer w0.4: v1(36.45,37.75) 34.95,39.25 34.95,46 35.254,46.304 U7.4
  Bottom Layer w0.4: DC13D.12@11.118,29.11 30.31,29.11 36.45,35.25 v1(36.45,37.75)
RC-23: DC13D.13 P12.2 | length 50.8
  Top Layer w0.5: v1(51.45,37.5) 53.7,37.5 57.171,40.971 P12.2
  Bottom Layer w0.5: DC13D.13@14.118,30.86 26.81,30.86 35.2,39.25 46.45,39.25 48.2,37.5 v1(51.45,37.5)
RC-24: DC13D.14 U7.11 | length 35.5
  Top Layer w0.4: U7.11 30.928,46.272 31.867,45.333 v1(31.867,39.167)
  Bottom Layer w0.4: DC13D.14@11.118,32.86 25.56,32.86 v1(31.867,39.167) v1@31.95,39.25
RC-25: DC13D.19 P13.2 | length 48.5
  Top Layer w0.4: v1(53.7,49.5) 57.171,52.971 P13.2
  Bottom Layer w0.4: DC13D.19@14.118,41.86 23.56,41.86 29.675,47.975 52.175,47.975 v1(53.7,49.5)
RC-26: DC13D.20 U8.4 | length 38.1
  Top Layer w0.4: 34.45,55.75 34.45,62.475 35.227,63.252 U8.4
  Bottom Layer w0.4: DC13D.20@10.868,43.61 22.81,43.61 v1(34.45,55.25)
RC-27: DC13D.21 P14.2 | length 57.3
  Top Layer w0.4: v1(28.654,51.296) 31.071,51.296 31.275,51.5 v1(44.95,51.5)
  Bottom Layer w0.4: DC13D.21@14.118,45.61 14.328,45.4 22.758,45.4 v1(28.654,51.296) ; v1(44.95,51.5) 44.95,60.5 46.45,62 56.45,62 57.171,62.721 P14.2
RC-28: DC13D.22 U8.11 | length 32.4
  Top Layer w0.4: U8.11 28.73,63.22 29.45,62.5 v1(29.45,55.25)
  Bottom Layer w0.4: DC13D.22@10.868,47.36 21.56,47.36 v1(29.45,55.25)
RC-29: DC13D.28 P15.2 | length 54.7
  Bottom Layer w0.4: DC13D.28 12.597,58.478 12.85,58.225 30.875,58.225 42.15,69.5 53.7,69.5 57.171,72.971 P15.2
RC-30: DC13D.29 U9.4 | length 42.4
  Top Layer w0.4: v1(31.11,59.985) 31.06,79.36 32.594,80.894 U9.4
  Bottom Layer w0.4: DC13D.29@14.368,59.985 v1(31.11,59.985)
RC-31: DC13D.31 P16.2 | length 79.6
  Bottom Layer w0.5: DC13D.31 12.816,63.584 12.575,63.825 9.625,63.825 8.7,64.75 8.7,74.01 8,74.71 8,77.7 8.7,78.4 8.7,82.85 15.462,89.612 56.588,89.612 57.171,89.029 P16.2
RC-32: DC13D.32 U9.11 | length 45.8
  Top Layer w0.5: DC13D.32@10.894,65.456 8.7,67.65 8.7,82.025 13.175,86.5 27.45,86.5 28.2,85.75 28.2,81.5 27.563,80.863 U9.11
UPR-1: DC13C.7 R1.2 R34.2 | length 46.4
  Top Layer w0.4: R34.2@82.817,82.852 87.975,82.852 88.075,82.852 88.075,86.125 88.7,86.75 102.2,86.75 104.95,84 ; DC13C.7@99.654,69.349 104.42,69.349 104.95,69.879
  Top Layer w0.5: 104.95,69.879 104.95,84
  other v1: 82.8,82.9 87.975,82.911
UPR-2: DC13C.8 R2.2 R35.2 | length 21.2
  Top Layer w0.4: R2.2@93.742,80.779 94.175,80.346 94.175,78.125 93.701,77.651 R35.2 95.189,76.38 95.95,75.619 v1(95.95,74.25)
  Bottom Layer w0.4: v1(95.95,74.25) 95.95,69 97.351,67.599 DC13C.8@102.654,67.599
UPR-3: DC13C.9 R3.2 R36.2 | length 10.7
  Top Layer w0.4: R3.2 94.736,66.714 93.701,67.749 v1(93.701,68.839) 95.711,68.839 98.728,65.822 DC13C.9 ; DC13C.9@99.404,65.599 DC13C.9@99.654,65.599
  other v1: 94.675,65.8
UPR-4: DC13C.10 R4.2 R37.2 | length 35.3
  Top Layer w0.4: R37.2@73.93,71.381 73.93,68.333 74.057,68.206 R4.2 75.769,68.206 76.45,67.525 v1(76.45,66.5)
  Bottom Layer w0.4: v1@76.335,66.635 76.875,67.175 78.502,67.175 78.827,66.85 79.573,66.85 79.898,67.175 95.01,67.175 98.31,63.875 102.654,63.875 DC13C.10@102.654,64.099
  other v1: 73.975,71.625
UPR-5: DC13C.15 R5.2 R38.2 | length 19.4
  Top Layer w0.4: R38.2@85.1,62.15 R5.2@87.9,62.15 ; R5.2@88.275,62.225 95.194,62.225 97.2,60.219 97.2,56.491 98.842,54.849 DC13C.15@99.654,54.849
  other v1: 85.15,62.175 88.25,62.2
UPR-6: DC13C.16 R6.2 R39.2 | length 18.4
  Top Layer w0.4: R6.2 94.911,59.952 95.644,59.219 95.644,55.506 98.1,53.05 102.331,53.05 DC13C.16@102.628,52.753 ; v1(93.475,59.925) 93.475,58.05 93.85,57.675 R39.2
UPR-7: DC13C.17 R7.2 R40.2 | length 10.2
  Top Layer w0.4: R40.2 93.95,46.729 94.25,46.429 R7.2 ; R40.2@93.975,47.575 95.65,47.575 99.174,51.099 DC13C.17@99.654,51.099
UPR-8: DC13C.18 R8.2 R41.2 | length 33
  Top Layer w0.4: R41.2 v1(73.9,50.825) 73.9,49.611 74.7,48.811 R8.2
  Bottom Layer w0.4: v1(73.9,50.825) 74.225,50.5 96.625,50.5 97.82,49.305 102.826,49.305 DC13C.18@102.878,49.253
UPR-9: DC13C.23 R9.2 R42.2 | length 21.9
  Top Layer w0.4: R42.2@83.201,44 83.426,44.225 R9.2 ; v1@85.95,42 85.95,44
  Bottom Layer w0.4: v1(85.95,42) 87.591,40.359 DC13C.23@99.654,40.359
UPR-10: DC13C.24 R10.2 R43.2 | length 13.7
  Top Layer w0.4: v1(93.975,37.661) 93.975,41.625 v1(94.25,41.9)
  Bottom Layer w0.4: v1(93.975,37.661) 94.312,37.661 95.195,38.544 102.709,38.544 DC13C.24@102.904,38.349
UPR-11: DC13C.25 R11.2 R44.2 | length 14.9
  Top Layer w0.4: v1(94.036,26.475) 94.036,29.45 94.05,29.464 R44.2 95.864,29.539 96.65,30.325 96.65,35.75 97.499,36.599 DC13C.25@99.654,36.599
UPR-12: DC13C.26 R12.2 R45.2 | length 36.3
  Top Layer w0.254: R45.2 73.139,31.986 74.05,31.075 v1(74.05,30.05)
  Bottom Layer w0.254: v1(74.05,30.05) 74.05,33.65 75.343,34.943 100.35,34.943 100.65,34.643 DC13C.26
UPR-13: DC13C.31 R13.2 R46.2 | length 20
  Top Layer w0.4: R46.2 R13.2 ; R13.2@84.699,24.284 84.733,24.25 v1(84.9,24.25) v1(89.95,24.25)
  Bottom Layer w0.4: v1(89.95,24.25) 94.7,24.25 96.299,25.849 DC13C.31@99.654,25.849
  other v1: 80.6,24.175
UPR-14: DC13C.32 R14.2 R47.2 | length 14.8
  Top Layer w0.4: R47.2@93.742,18.225 93.742,18.041 R47.2@93.869,17.914 ; v1(93.925,18.225) 94.056,18.356 R14.2 94.056,23.331 94.728,24.003 100.275,24.003 100.623,23.654 DC13C.32
  other v1: 94.025,22.35
UPR-15: DC13C.33 R15.2 R48.2 | length 20.6
  Top Layer w0.4: v1(93.55,6.075) 93.55,7.95 93.925,8.325 R48.2 95.214,9.964 95.825,10.575 95.825,20.375 97.752,22.302 DC13C.33@99.654,22.302
UPR-16: DC13C.34 R16.2 R49.2 | length 42
  Top Layer w0.4: R49.2 73.389,12.336 73.9,11.825 v1(73.9,10.475) R16.2 75.757,10.468 77.475,8.75 83.906,8.75 v1(85.45,10.294)
  Bottom Layer w0.4: v1(85.45,10.294) 85.494,10.294 85.99,10.79 85.99,18.04 88.35,20.4 102.731,20.4 DC13C.34@102.878,20.253
  other v1: 73.35,13.375
UPR-17: DC13D.7 R18.2 R51.2 | length 32.8
  Top Layer w0.4: v1(41.375,25.225) 41.4,25.2 v1(44.825,25.2)
  Bottom Layer w0.4: DC13D.7@14.118,20.11 25.635,20.11 25.975,20.45 34.9,20.45 39.675,25.225 v1(41.375,25.225)
UPR-18: DC13D.8 R19.2 R52.2 | length 16.4
  Top Layer w0.4: v1(22.625,22.125) 22.677,22.177 R52.2
  Bottom Layer w0.4: DC13D.8@11.118,21.86 16.61,21.86 16.9,22.15 22.6,22.15 v1(22.625,22.125)
UPR-19: DC13D.9 R20.2 R53.2 | length 16
  Top Layer w0.4: v1(19.45,24) 20.45,24 20.95,24.5 20.95,28.681 20.489,29.142 R20.2 R53.2
  Bottom Layer w0.4: DC13D.9 17.161,23.636 17.525,24 v1(19.45,24)
UPR-20: DC13D.10 R21.2 R54.2 | length 40.9
  Top Layer w0.4: R54.2 v1(41.47,33.156) 41.489,33.175 43.15,33.175 ; v1(43.15,29.3) 43.15,33.175 ; v1(44.825,33.175) 43.15,33.175
  Bottom Layer w0.4: DC13D.10@11.118,25.36 DC13D.10@11.218,25.46
  Bottom Layer w0.5: DC13D.10@11.218,25.46 31.16,25.46 35,29.3 v1(43.15,29.3)
UPR-21: DC13D.15 R22.2 R55.2 | length 34
  Top Layer w0.5: R55.2@40.7,42.085 R55.2@40.711,42.096 ; v1(40.929,42.15) 40.954,42.175 R55.2 v1(44.425,42.175)
  Bottom Layer w0.5: DC13D.15@14.118,34.61 24.31,34.61 29.825,40.125 39.9,40.125 40.929,41.154 v1(40.929,42.15)
UPR-22: DC13D.16 R23.2 R56.2 | length 22.2
  Top Layer w0.4: R23.2 25.35,38.9 v1(25.7,39.25) ; R23.2@22.804,39.429 R56.2@22.804,42.731
  Bottom Layer w0.4: DC13D.16@11.144,36.706 11.45,36.4 22.85,36.4 v1(25.7,39.25)
  other v1: 22.825,38.892
UPR-23: DC13D.17 R24.2 R57.2 | length 15.1
  Top Layer w0.4: DC13D.17@14.118,38.36 16.31,38.36 16.95,39 16.95,43 18.831,44.881 R24.2 ; R24.2@20.2,45.025 20.2,46.8 20.564,47.164 R57.2
UPR-24: DC13D.18 R25.2 R58.2 | length 41.4
  Top Layer w0.4: R58.2@41.025,49.4 R58.2 42.725,49.475 ; v1(42.725,45.75) 42.725,49.475 ; R25.2 42.725,49.475
  Bottom Layer w0.4: DC13D.18@10.894,40.206 24.656,40.206 30.2,45.75 v1(42.725,45.75)
  other v1: 40.875,49.475 44.475,49.475
UPR-25: DC13D.23 R26.2 R59.2 | length 36.6
  Top Layer w0.4: v1(40.675,55.65) 40.675,58.892 v1(40.8,59.017) ; R59.2 v1(40.8,59.017) ; v1(43.8,59.067) 40.85,59.067 v1(40.8,59.017)
  Bottom Layer w0.4: DC13D.23@14.118,49.11 21.06,49.11 28.654,56.704 39.496,56.704 40.55,55.65 v1(40.675,55.65)
UPR-26: DC13D.24 R27.2 R60.2 | length 22.8
  Top Layer w0.4: R60.2 23,57.375 23.19,57.185 R27.2 25.385,55.685 v1(25.45,55.75)
  Bottom Layer w0.4: DC13D.24@10.868,51.11 20.81,51.11 v1(25.45,55.75)
UPR-27: DC13D.26 R28.2 R61.2 | length 23.3
  Top Layer w0.4: DC13D.26@10.868,54.61 10.968,54.51 16.21,54.51 17.225,55.525 v1(17.225,63.475) ; R61.2@20.264,65.591 20.297,65.558 20.391,65.464 R28.2
  Bottom Layer w0.4: v1(17.225,63.475) 17.225,64.75 18.117,65.642 v1(20.375,65.642)
  other v1: 20.425,61.917
UPR-28: DC13D.27 R29.2 R62.2 | length 41.5
  Top Layer w0.254: R62.2 40.831,66.494 v1(43.8,66.494)
  Bottom Layer w0.254: DC13D.27@14.118,56.11 15.558,57.55 41.325,57.55 42.2,58.425 42.2,66.05 42.644,66.494 v1(43.8,66.494)
  other v1: 40.8,66.517
UPR-29: DC13D.33 R30.2 R63.2 | length 38.2
  Top Layer w0.4: v1(41.45,73) 42.15,73.7 42.15,78.394 R63.2 44.544,78.519 R30.2
  Bottom Layer w0.4: DC13D.33@14.118,67.11 35.56,67.11 v1(41.45,73)
  other v1: 44.55,78.467 42.025,78.492
UPR-30: DC13D.34 R31.2 R64.2 | length 19
  Top Layer w0.4: R64.2 22.677,73.677 22.804,73.55 v1@22.804,71.604
  Bottom Layer w0.4: DC13D.34@10.894,69.206 20.406,69.206 v1(22.7,71.5)
  other v1: 22.625,77.717
UPR-31: DC13D.35 R32.2 R65.2 | length 15.8
  Top Layer w0.4: DC13D.35@14.118,70.86 17.95,74.692 17.95,79.25 18.774,80.074 R32.2 19.907,80.05 v1(19.975,80.05) 19.975,83.152 R65.2@19.756,83.371
  other v1: 19.775,83.442
UPR-32: DC13D.36 R33.2 R66.2 | length 47.1
  Top Layer w0.4: v1(42.025,82.133) 42.033,82.125 R33.2
  Bottom Layer w0.4: DC13D.36@10.894,72.706 10.894,72.877 8.925,74.846 8.925,77.5 9.925,78.5 11.95,78.5 15.506,82.056 32.006,82.056 35.25,85.3 41.05,85.3 42.025,84.325 v1(42.025,82.133)
  other v1: 44.55,82.117
UPR-IXPRAVN: DC13C.35 R17.2 R50.2 | length 88
  Top Layer w0.4: R50.2@40.457,8.568 v1(40.457,8.182) 40.457,7.182 39.889,6.614 R17.2 39.889,4.511 40.414,3.986 101.557,3.986 105.95,8.379 105.95,16.653 104.453,18.15 101.6,18.15 101.138,18.612 DC13C.35
pads on no net: DC13D.25 P1.1 P2.1 P3.1 P4.1 P5.1 P6.1 P7.1 P8.1 P9.1 P10.1 P11.1 P12.1 P13.1 P14.1 P15.1 P16.1 U1.1 U1.8 U2.1 U2.8 U3.1 U3.8 U4.1 U4.8 U5.1 U5.3 U5.4 U5.5 U5.6 U5.7 U5.8 U5.9 U5.10 U5.11 U5.12 U6.1 U6.8 U7.1 U7.8 U8.1 U8.8 U9.1 U9.8
copper on no net:
  other v1: 74.95,17.5 75.35,23.9

## Polygon pours and split planes (outlines as drawn)
GND on Top Layer "Top Layer-No Net" (solid, pour order 8): -0.331,21.203 7.669,21.203 7.669,73.203 -0.331,73.203 -0.331,94.203 104.837,94.203 cw(c104.837,92.203) 106.809,92.536 ccw(c116.669,94.203) 115.002,84.343 cw(c114.669,82.371) 116.669,82.371 116.669,55.203 cw(c113.669,55.203) 113.669,52.203 ccw(c113.669,47.203) 113.669,42.203 cw(c113.669,39.203) 116.669,39.203 116.669,12.035 cw(c114.669,12.035) 115.002,10.063 ccw(c116.669,0.203) 106.809,1.869 cw(c104.837,2.203) 104.837,0.203 -0.331,0.203
GND on Bottom Layer "Top Layer-No Net1" (solid, pour order 9): -0.331,21.203 7.669,21.203 7.669,73.203 -0.331,73.203 -0.331,94.203 104.837,94.203 cw(c104.837,92.203) 106.809,92.536 ccw(c116.669,94.203) 115.002,84.343 cw(c114.669,82.371) 116.669,82.371 116.669,55.203 cw(c113.669,55.203) 113.669,52.203 ccw(c113.669,47.203) 113.669,42.203 cw(c113.669,39.203) 116.669,39.203 116.669,12.035 cw(c114.669,12.035) 115.002,10.063 ccw(c116.669,0.203) 106.809,1.869 cw(c104.837,2.203) 104.837,0.203 -0.331,0.203

## Keep-outs
Keep-Out Layer:
  the board outline again, w0.013

## Silkscreen, mask and mechanical layers (free items; w line width, h text height)
Top Overlay:
  lines w0.2: 7.422,80.45 8.372,80.45 ; 7.425,10.8 8.375,10.8 ; 16.5,9 17.45,9 ; 16.5,23.675 17.45,23.675 ; 16.5,41.85 17.45,41.85 ; 16.5,78 17.45,78 ; 16.525,60 17.475,60 ; 96.3,47.624 97.25,47.624 ; 96.322,11.375 97.272,11.375 ; 96.322,80.3 97.272,80.3 ; 96.326,65.822 97.276,65.822 ; 96.35,29.442 97.3,29.442 ; 105.4,8.925 106.35,8.925 ; 105.4,45.657 106.35,45.657 ; 105.4,78.55 106.35,78.55 ; 105.425,27.342 106.375,27.342 ; 105.45,63.975 106.4,63.975
  lines w0.3: 78.05,89.975 78.05,93.2 96.2,93.2 96.2,89.975 78.05,89.975
  text "A313-V.07" at 76.75,90.6 h2
  text "40" at 7.825,81.025 h0.8 r90
  text "1" at 96.825,80.75 h0.8 r90
  text "2" at 106.525,78.95 h0.8 r90
  text "39" at 17.65,76.1 h0.8 r90
  text "39" at 96.825,11.725 h0.8 r90
  text "2" at 7.9,9.6 h0.8 r90
  text "40" at 106.6,9.35 h0.8 r90
  text "1" at 17.75,8.2 h0.8 r90
Bottom Overlay:
  lines w0.2: 7.422,80.475 8.372,80.475 ; 7.425,10.8 8.375,10.8 ; 16.5,9 17.45,9 ; 16.5,23.675 17.45,23.675 ; 16.5,41.85 17.45,41.85 ; 16.5,78 17.45,78 ; 16.525,60 17.475,60 ; 96.3,47.624 97.25,47.624 ; 96.322,80.3 97.272,80.3 ; 96.326,65.822 97.276,65.822 ; 96.347,11.4 97.297,11.4 ; 96.35,29.442 97.3,29.442 ; 105.4,45.657 106.35,45.657 ; 105.4,78.55 106.35,78.55 ; 105.425,8.925 106.375,8.925 ; 105.425,27.342 106.375,27.342 ; 105.45,63.975 106.4,63.975
  lines w0.254: 8.375,7.075 8.375,82.525 16.475,82.525 16.475,7.075 8.375,7.075 ; 97.325,6.85 97.325,82.4 97.4,82.475 105.425,82.475 105.425,6.925 105.35,6.85 97.325,6.85
  text "40" at 7.05,81.025 h0.8 r270
  text "1" at 96.025,80.75 h0.8 r270
  text "2" at 105.8,78.975 h0.8 r270
  text "39" at 16.85,76.1 h0.8 r270
  text "39" at 96.025,11.75 h0.8 r270
  text "2" at 7.1,9.575 h0.8 r270
  text "40" at 105.825,9.4 h0.8 r270
  text "1" at 16.975,8.225 h0.8 r270
Mechanical 1:
  circle w0.013: c3.669,15.203 r1.6
  circle w0.013: c3.669,79.203 r1.6
  circle w0.01: c112.669,79.203 r1.6
  circle w0.013: c112.669,15.203 r1.6